# Altium PCB BopIt.PcbDoc
Units mil, origin at the board's own origin, x right, y up, seen from the top; angles counter-clockwise.
Board outline 6000 x 4000 mil, 4 copper layers (Top Layer, Layer 1, Layer 2, Bottom Layer), stack 23.756 mil thick; 39 components, 36 nets, 147 pads, 0 vias.
Unrouted connection lines stored in the file: 96.
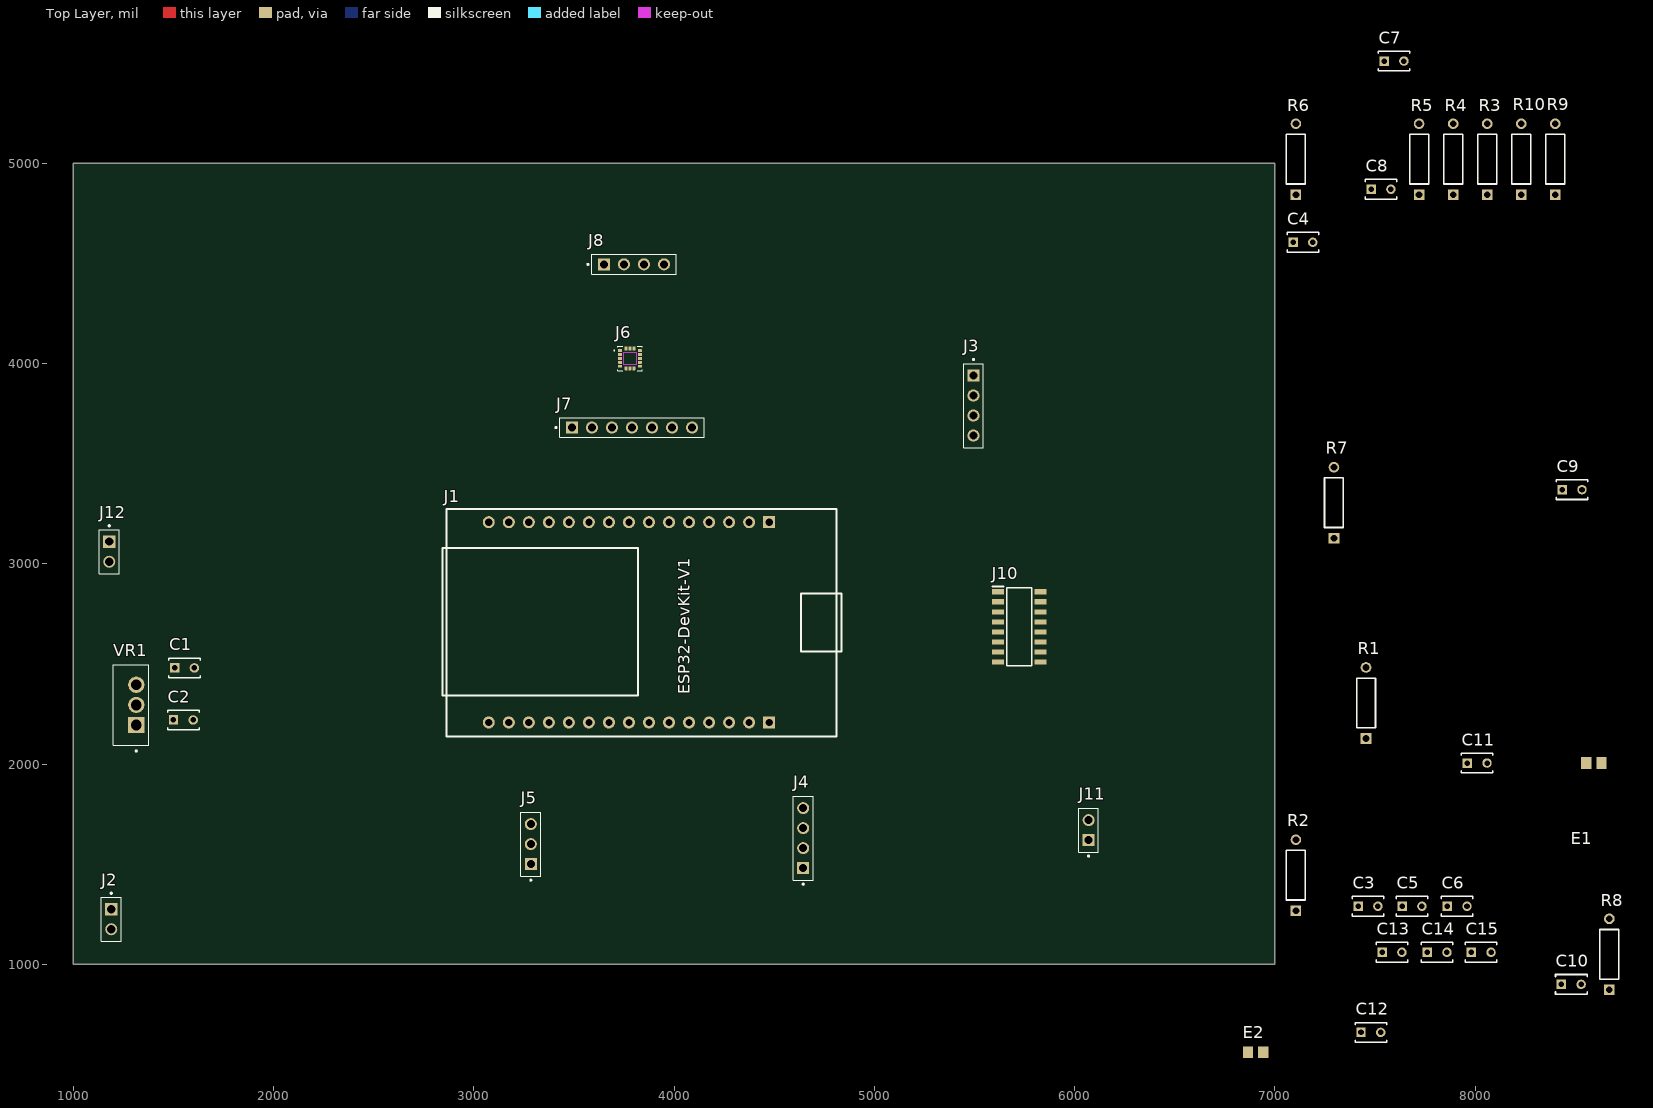
[diagram p0: Top Layer view]
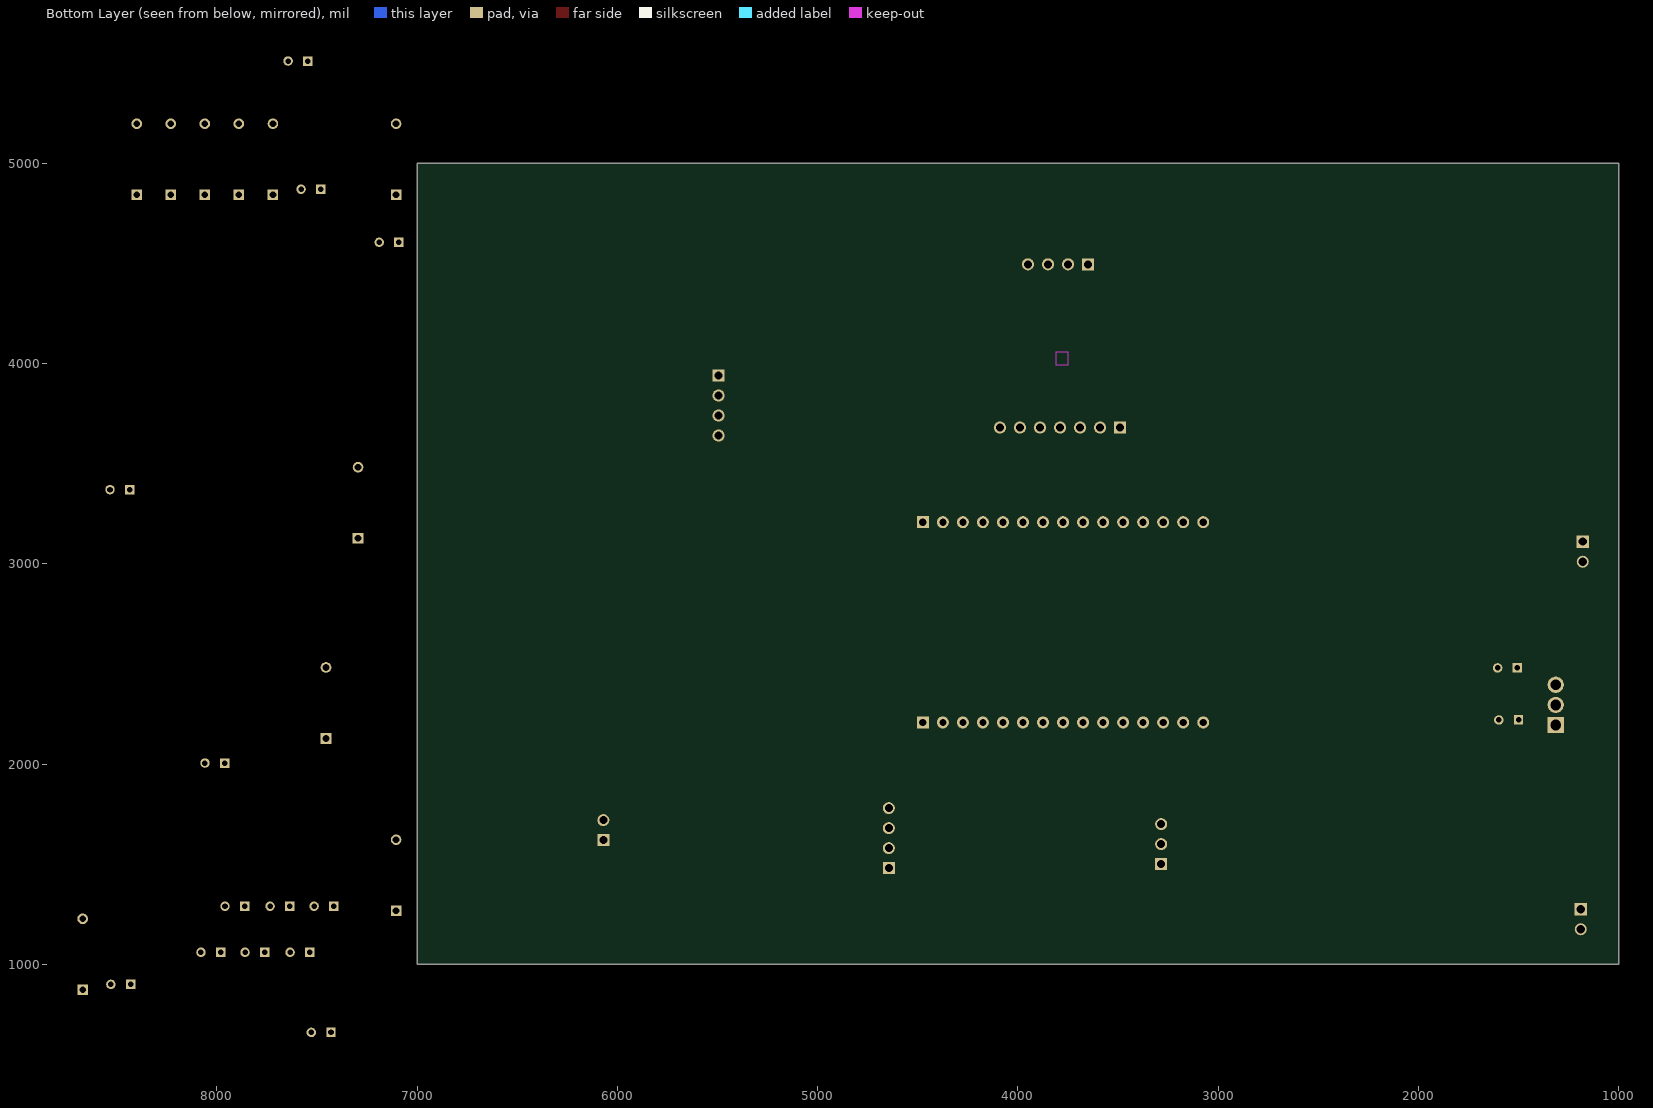
[diagram p1: Bottom Layer view, seen from below]
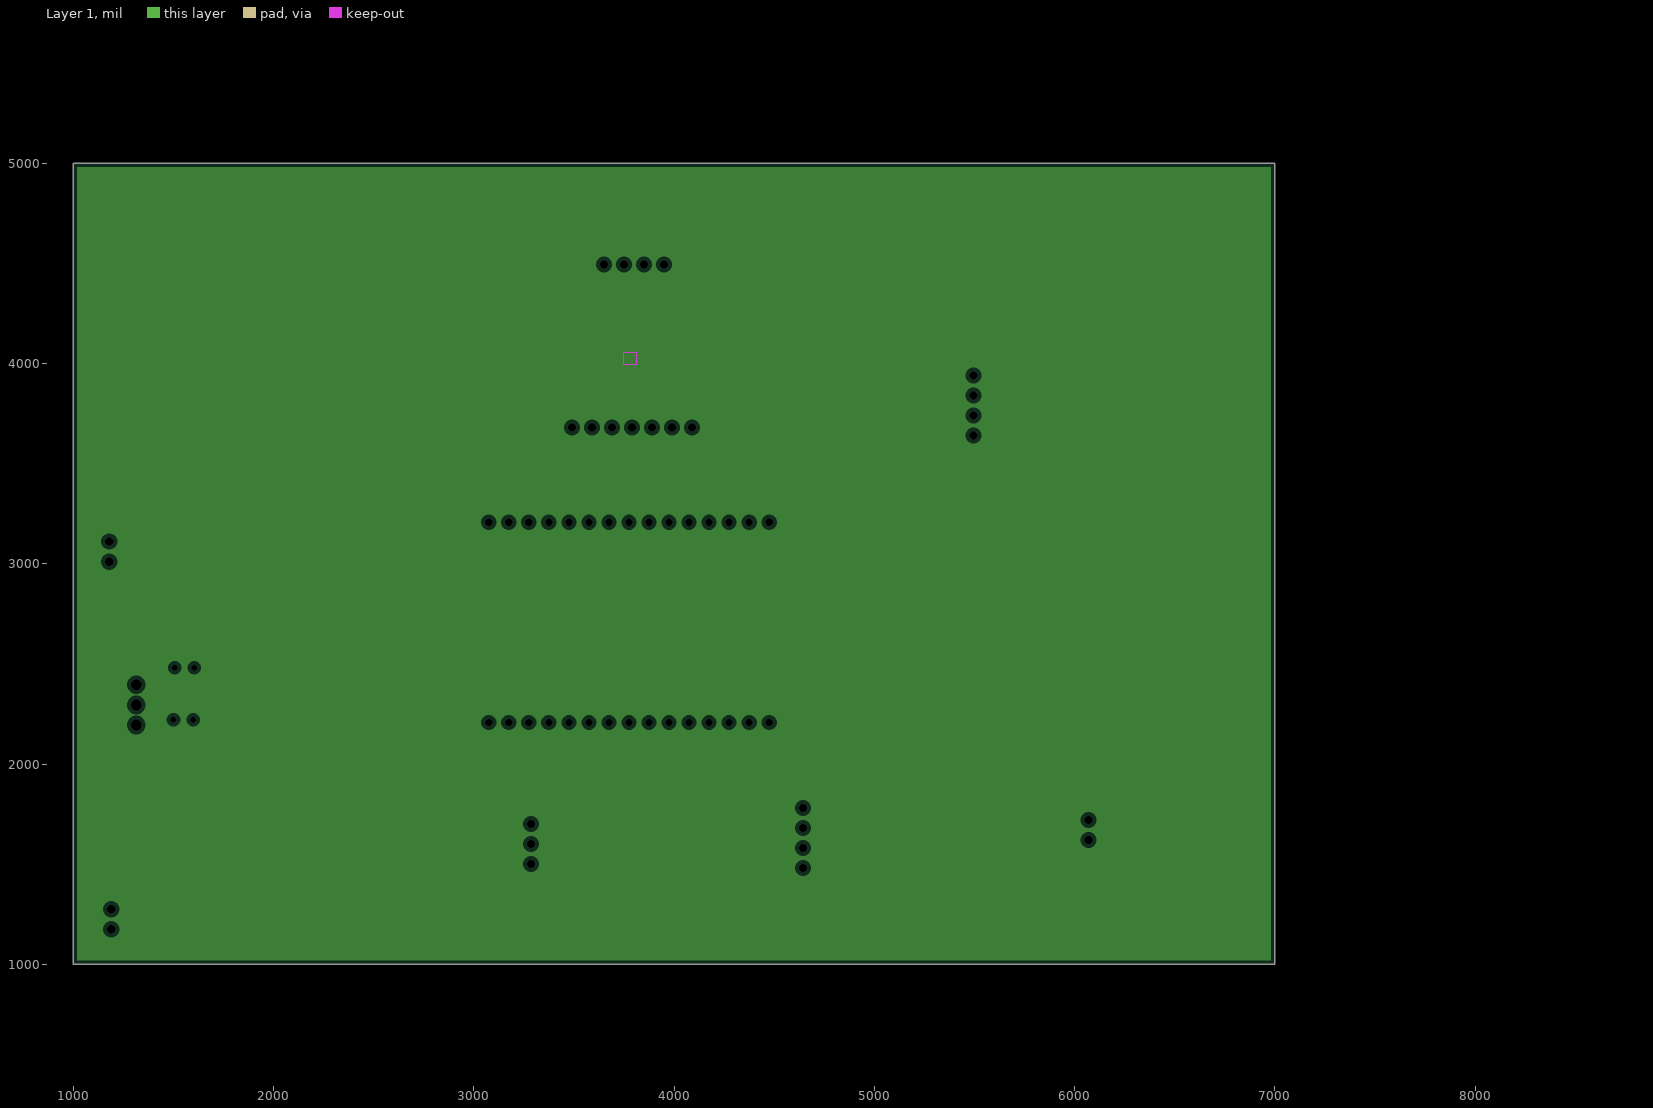
[diagram p2: Layer 1, clearances drawn from the general rule]
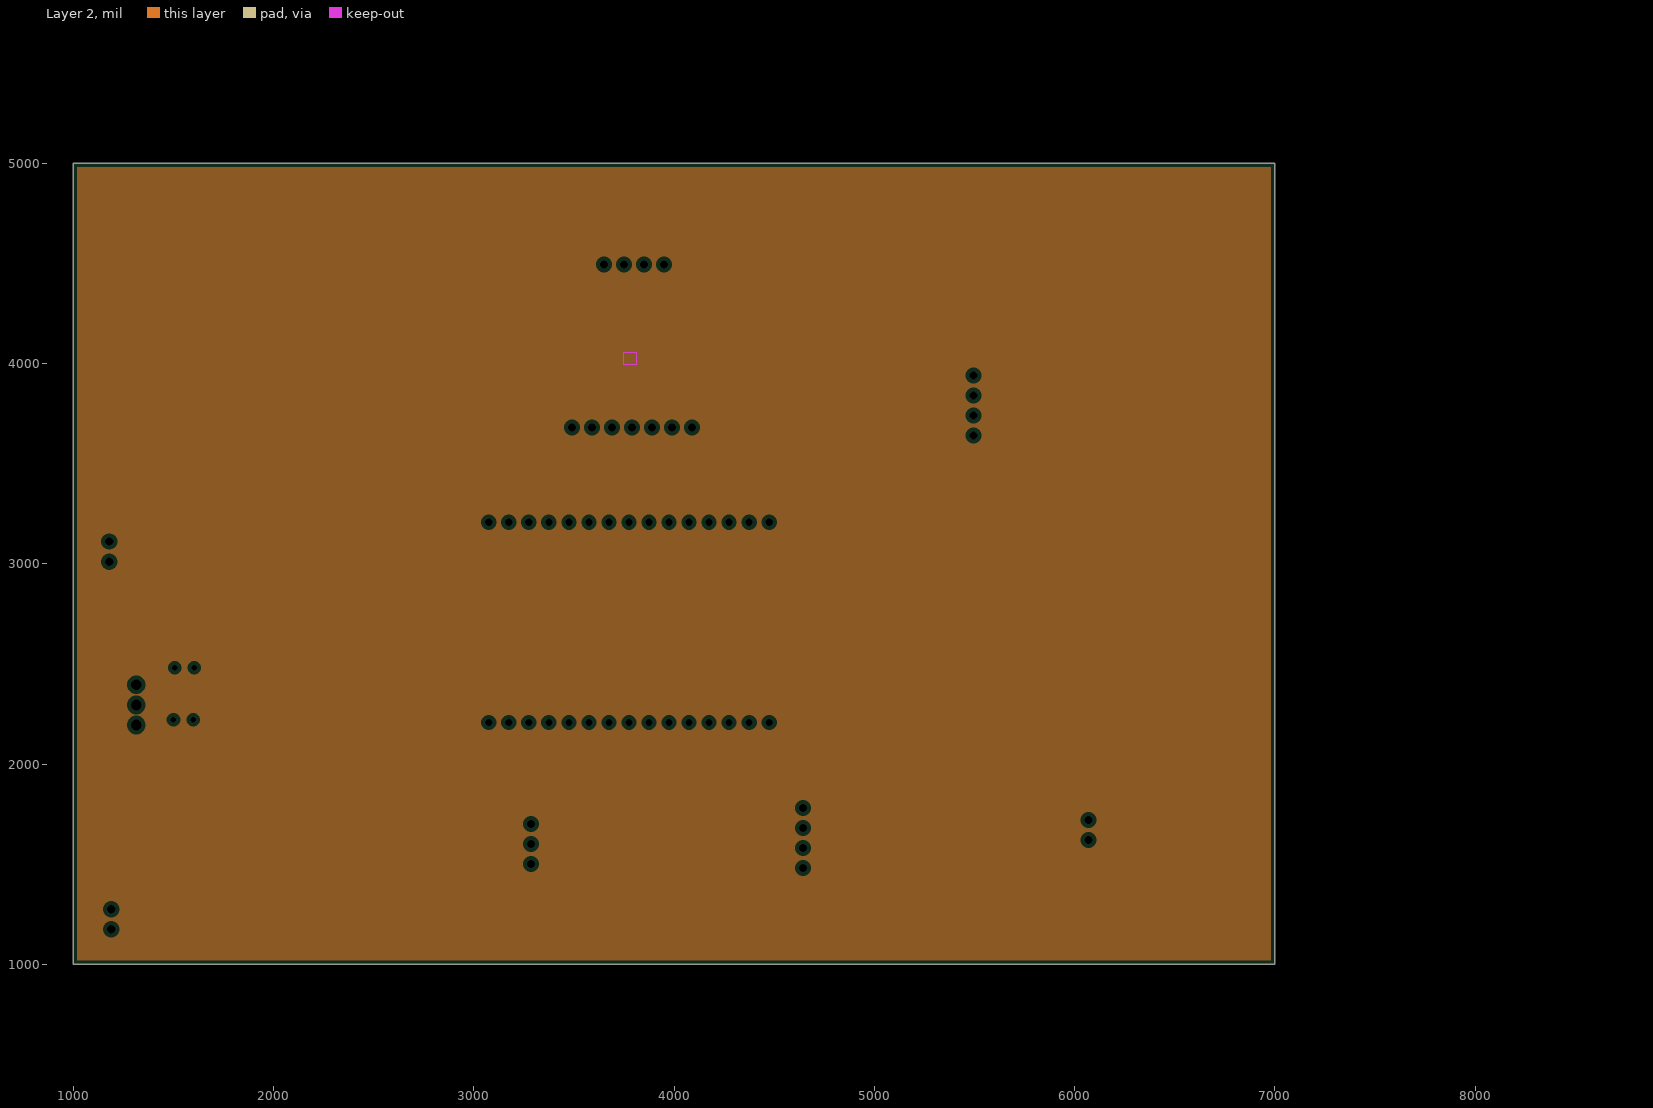
[diagram p3: Layer 2, clearances drawn from the general rule]

## Layer stack, top to bottom
Top Solder: solder mask 0.4, Solder Resist, Dk 3.5
Top Layer: signal copper 1.4
Power Plane: prepreg 2.8, PP-006, Dk 4.1
Layer 1: plane copper 1.378
Dielectric 1: dielectric 12.6, FR-4, Dk 4.8
Layer 2: plane copper 1.378
Ground Plane: prepreg 2.8, PP-006, Dk 4.1
Bottom Layer: signal copper 1.4
Bottom Solder: solder mask 0.4, Solder Resist, Dk 3.5

## Board outline
1000,1000 7000,1000 7000,5000 1000,5000

## Design rules (kind name [scope] priority, off if disabled: settings)
Clearance [All] p1: gap=10 ignorepadtopadclearanceinfootprint=FALSE
PlaneClearance [All] p1: clearance=20
PlaneConnect [All] p1: planeconnectstyle=Relief reliefexpansion=20 reliefentries=4 reliefconductorwidth=10 reliefairgap=10
PolygonConnect [All] p1: connectstyle=Relief reliefconductorwidth=10 reliefentries=4 polygonreliefangle="90 Angle" airgapwidth=10
RoutingVias [All] p1: holewidth=28 width=50 viastyle="Through Hole" minholewidth=28 minwidth=50 maxholewidth=28 maxwidth=50
SolderMaskExpansion [All] p1: expansion=0 istentingtop=FALSE
SupplyNets "Schematic Supply Nets_7" [InNet('VRO')] p1: voltage=0.000
SupplyNets "Schematic Supply Nets_6" [InNet('3.3V')] p2: voltage=0.000
SupplyNets "Schematic Supply Nets_5" [InNet('+9')] p3: voltage=0.000
SupplyNets "Schematic Supply Nets_3" [InNet('+3.3V')] p4: voltage=0.000
SupplyNets "Schematic Supply Nets_2" [InNet('5V')] p5: voltage=0.000
SupplyNets "Schematic Supply Nets_1" [InNet('GND')] p6: voltage=0.000
SupplyNets "Schematic Supply Nets" [InNet('+5')] p7: voltage=0.000
Width [All] p1: maxlimit=10 minlimit=10 preferedwidth=10
28 further rules are at their usual default settings.

## Classes and differential pairs
component class Power: C1 C2 J2 J12 VR1
component class MicroSDAdapter: C12 C15 R3 R4 R5 R6 R9 R10
component class Input: C10 C12 C13 C15 J3 J4 J5 J6 R9 R10
component class Display: J7 J8
component class DevKitESP32: J1
component class AudioAmplifier: C10 C12 C13 C14 C15 E1 E2 J10 J11 R7 R8

## Components (designator, comment, footprint, x,y, rotation, side; value= is the part's Value field where it differs from the comment)
C1 "0.33uF" FP-RHE1DB-MFG 1555.79,2480 r0 top
C2 "0.1uF" FP-RHE1DB-MFG 1550,2220 r0 top
C3 "10nF" FP-RHE1DB-MFG 7465,1290 r0 top
C4 "0.47uF" FP-RHE1DB-MFG 7140,4605 r0 top
C5 "0.1uF" FP-RHE1DB-MFG 7685,1290 r0 top
C6 "2.2uF" FP-RHE1DB-MFG 7910,1290 r0 top
C7 "0.1uF" FP-RHE1DB-MFG 7595,5510 r0 top
C8 "0.1uF" FP-RHE1DB-MFG 7530,4870 r0 top
C9 "1uF" FP-RHE1DB-MFG 8484.21,3370 r0 top
C10 "1uF" FP-RHE1DB-MFG 8480,900 r0 top
C11 "10uF" FP-RHE1DB-MFG 8010,2005 r0 top
C12 "10uF" FP-RHE1DB-MFG 7479.21,660 r0 top
C13 "1uF" FP-RHE1DB-MFG 7585,1060 r0 top
C14 "1uF" FP-RHE1DB-MFG 7810,1060 r0 top
C15 "1uF" FP-RHE1DB-MFG 8030,1060 r0 top
E1 "LI0805H121R-10" FB_LI0805H121R-10 8593.31,2005 r0 top
E2 "LI0805H121R-10" FB_LI0805H121R-10 6903.31,560 r0 top
J1 "J1" ESP32-DEVKIT-V1-FOOTPRINT 3840,2705 r90 top
J2 "SSK02-FPH-254-A2" SAMESKY_SSK02-FPH-254-A2 1190,1225 r270 top
J3 "SSK02-FPH-254-A4" SAMESKY_SSK02-FPH-254-A4 5495,3790 r270 top
J4 "SSK02-FPH-254-A4" SAMESKY_SSK02-FPH-254-A4 4645,1630 r90 top
J5 "SSK02-FPH-254-A3" SAMESKY_SSK02-FPH-254-A3 3285,1600 r90 top
J6 "IAM-20380" PQFN50P300X300X80-16N 3780,4025 r0 top
J7 "SSK02-FPH-254-A7" SAMESKY_SSK02-FPH-254-A7 3790,3680 r0 top
J8 "SSK02-FPH-254-A4" SAMESKY_SSK02-FPH-254-A4 3800,4495 r0 top
J10 "PAM8406DR" SOIC127P600X126-16N 5723.7,2685 r0 top
J11 "SSK02-FPH-254-A2" SAMESKY_SSK02-FPH-254-A2 6070,1670 r90 top
J12 "SSK02-FPH-254-A2" SAMESKY_SSK02-FPH-254-A2 1180,3060 r270 top
R1 "10K" RESA60-630X240 7455,2305 r90 top
R2 "10K" RESA60-630X240 7105,1445 r90 top
R3 "10K" RESA60-630X240 8060,5020 r90 top
R4 "10K" RESA60-630X240 7890,5020 r90 top
R5 "10K" RESA60-630X240 7720,5020 r90 top
R6 "10K" RESA60-630X240 7105,5020 r90 top
R7 "10K" RESA60-630X240 7295,3305 r90 top
R8 "10K" RESA60-630X240 8670,1050 r90 top
R9 "10K" RESA60-630X240 8400,5020 r90 top
R10 "10K" RESA60-630X240 8230,5020 r90 top
VR1 "L7805" TO255P1020X450X2000-3 1288.92,2295.39 r90 top

## Footprints (in the part's own frame and the unit in brackets; to place one, negate y for a bottom-side part, rotate by r counter-clockwise, add the part's x,y. Pads: shape width x height; smd on the part's side, far side on the other; paste and mask are expansions set on the pad)
ESP32-DEVKIT-V1-FOOTPRINT [mil]
  round 60 hole 36 paste-99999 mask+4: 1(-497.5,765) 2(-497.5,665) 3(-497.5,565) 4(-497.5,465) 5(-497.5,365) 6(-497.5,265) 7(-497.5,165) 8(-497.5,65) 9(-497.5,-35) 10(-497.5,-135) 11(-497.5,-235) 12(-497.5,-335) 13(-497.5,-435) 14(-497.5,-535) 17(502.5,-535) 18(502.5,-435) 19(502.5,-335) 20(502.5,-235) 21(502.5,-135) 22(502.5,-35) 23(502.5,65) 24(502.5,165) 25(502.5,265) 26(502.5,365) 27(502.5,465) 28(502.5,565) 29(502.5,665) 30(502.5,765)
  rect 60x60 hole 36 paste-99999 mask+4: 15(-497.5,-635) 16(502.5,-635)
  silkscreen extent -568,-995 568,995
FB_LI0805H121R-10 [mm]
  rect 1.285x1.47 smd: 1(-0.973,0) 2(0.973,0)
  body extent -1,-0.63 1,0.63, height 1.1
FP-RHE1DB-MFG [mm]
  rect 1.2x1.2 hole 0.7 paste-2539.97 mask+0: 1(-1.25,0)
  round 1.2 hole 0.7 paste-2539.97 mask+0: 2(1.25,0)
  silkscreen extent -2,-1.25 2,1.25, body extent -2.1,-1.35 2.1,1.35, height 0.25
PQFN50P300X300X80-16N [mm]
  rrect25% 0.49x0.35 smd: 1(-1.26,1) 2(-1.26,0.5) 3(-1.26,0) 4(-1.26,-0.5) 5(-1.26,-1) 9(1.26,-1) 10(1.26,-0.5) 11(1.26,0) 12(1.26,0.5) 13(1.26,1)
  rrect25% 0.35x0.49 smd: 6(-0.5,-1.26) 7(0,-1.26) 8(0.5,-1.26) 14(0.5,1.26) 15(0,1.26) 16(-0.5,1.26)
  Keep-Out Layer region: 0.8,-0.8 -0.8,-0.8 -0.8,0.8 0.8,0.8
  silkscreen extent -2.05,-1.55 1.55,1.55, body extent -1.5,-1.5 1.5,1.5, height 0.8
RESA60-630X240 [mm] "Axial Resistor, 2-Leads, Dia 2.4mm, Body Length 6.3mm"
  rect 1.35x1.35 hole 0.85: 1(-4.5,0)
  round 1.35 hole 0.85: 2(4.5,0)
  silkscreen extent -3.15,-1.2 3.15,1.2, body extent -3.15,-1.2 3.15,1.2, height 2.4
SAMESKY_SSK02-FPH-254-A2 [mm]
  rect 1.53x1.53 / inner round 1.53 / far side rect 1.53x1.53 hole 1.02 mask+0.102: 1(-1.27,0)
  round 1.53 hole 1.02 mask+0.102: 2(1.27,0)
  silkscreen extent -3.4,-1.25 2.79,1.25
SAMESKY_SSK02-FPH-254-A3 [mm]
  rect 1.53x1.53 / inner round 1.53 / far side rect 1.53x1.53 hole 1.02 mask+0.102: 1(-2.54,0)
  round 1.53 hole 1.02 mask+0.102: 2(0,0) 3(2.54,0)
  silkscreen extent -4.67,-1.25 4.06,1.25
SAMESKY_SSK02-FPH-254-A4 [mm]
  rect 1.53x1.53 / inner round 1.53 / far side rect 1.53x1.53 hole 1.02 mask+0.102: 1(-3.81,0)
  round 1.53 hole 1.02 mask+0.102: 2(-1.27,0) 3(1.27,0) 4(3.81,0)
  silkscreen extent -5.94,-1.25 5.33,1.25
SAMESKY_SSK02-FPH-254-A7 [mm]
  rect 1.53x1.53 / inner round 1.53 / far side rect 1.53x1.53 hole 1.02 mask+0.102: 1(-7.62,0)
  round 1.53 hole 1.02 mask+0.102: 2(-5.08,0) 3(-2.54,0) 4(0,0) 5(2.54,0) 6(5.08,0) 7(7.62,0)
  silkscreen extent -9.75,-1.25 9.14,1.25
SOIC127P600X126-16N [mm]
  rect 1.5x0.65 smd: 1(-2.7,4.445) 2(-2.7,3.175) 3(-2.7,1.905) 4(-2.7,0.635) 5(-2.7,-0.635) 6(-2.7,-1.905) 7(-2.7,-3.175) 8(-2.7,-4.445) 9(2.7,-4.445) 10(2.7,-3.175) 11(2.7,-1.905) 12(2.7,-0.635) 13(2.7,0.635) 14(2.7,1.905) 15(2.7,3.175) 16(2.7,4.445)
  silkscreen extent -3.45,-4.95 1.6,5.12
TO255P1020X450X2000-3 [mm]
  rect 2.055x2.055 / inner round 2.055 / far side rect 2.055x2.055 hole 1.37: 1(-2.55,-0.663)
  round 2.055 hole 1.37: 2(0,-0.663) 3(2.55,-0.663)
  silkscreen extent -5.95,-2.25 5.1,2.25, body extent -5.1,-2.25 5.1,2.25, height 20

## Part data
C1 C2 C3 C4 C5 C6 C7 C8 C9 C10 C11 C12 C13 C14 C15: library part CMP-06035-012170-1, "Ceramic Capacitor Automotive 330nF ±10% 50V X8L Radial", Capacitance=330nF, Dielectric=X8L, Max Operating Temperature=150°C, Min Operating Temperature=-55°C, Tolerance=10%, Voltage Rating=50V, Lead Pitch=2.5mm, REACH SVHC="No SVHC", Voltage Rating (DC)=50V
E1 E2: "EMI Ferrite Chip Bead, 0805, 800MA, 120Ohms @100MHz, DCR Max 0.150Ohm", Package="0805 Laird", Check_prices=https://www.snapeda.com/parts/LI0805H121R-10/Laird/view-part/?ref=eda, MF=Laird, MP=LI0805H121R-10, SnapEDA_Link=https://www.snapeda.com/parts/LI0805H121R-10/Laird/view-part/?ref=snap
J1: library part Component_1
J2 J11 J12: "2 Position Header Connector 0.100 (2.54mm) Through Hole Gold", Package=None, Check_prices=https://www.snapeda.com/parts/SSK02-FPH-254-A2/Same+Sky/view-part/?ref=eda, MF="Same Sky (Formerly CUI Devices)", MP=SSK02-FPH-254-A2, SnapEDA_Link=https://www.snapeda.com/parts/SSK02-FPH-254-A2/Same+Sky/view-part/?ref=snap
J3 J4 J8: "4 Position Header Connector 0.100 (2.54mm) Through Hole Gold", Package=None, Check_prices=https://www.snapeda.com/parts/SSK02-FPH-254-A4/Same+Sky/view-part/?ref=eda, MF="Same Sky (Formerly CUI Devices)", MP=SSK02-FPH-254-A4, SnapEDA_Link=https://www.snapeda.com/parts/SSK02-FPH-254-A4/Same+Sky/view-part/?ref=snap
J5: "2.54MM FEMALE HEADER 1X3PIN, Y T", Package=None, Check_prices=https://www.snapeda.com/parts/SSK02-FPH-254-A3/Same+Sky/view-part/?ref=eda, MF="Same Sky (Formerly CUI Devices)", MP=SSK02-FPH-254-A3, SnapEDA_Link=https://www.snapeda.com/parts/SSK02-FPH-254-A3/Same+Sky/view-part/?ref=snap
J6: "Gyroscope X (Pitch), Y (Roll), Z (Yaw) Â±250, 500, 1000, 2000 27kHz I2C, SPI 16-LGA (3x3)", Package="PQFN-16 TDK-InvenSense", Check_prices=https://www.snapeda.com/parts/IAM-20380/TDK/view-part/?ref=eda, MF="TDK InvenSense", MP=IAM-20380, SnapEDA_Link=https://www.snapeda.com/parts/IAM-20380/TDK/view-part/?ref=snap
J7: Package=None, Availability=Unavailable, MF="{'manufacturer': u'Same Sky (Formerly CUI Devices)'}", MP=SSK02-FPH-254-A7, Price=None
J10: "DiodesZetex PAM8406DR 2-Channel Audio Amplifier, Class-AB, Class-D Stereo, 16-Pin SOP", Manufacturer_Name="Diodes Incorporated", Mouser Part Number=621-PAM8406DR, Arrow Part Number=PAM8406DR, Arrow Price/Stock=https://www.arrow.com/en/products/pam8406dr/diodes-incorporated?utm_currency=USD&region=asia, Datasheet Link=https://www.diodes.com//assets/Datasheets/PAM8406.pdf, Geometry.Height=1.26mm, Manufacturer_Part_Number=PAM8406DR, Mouser Price/Stock=https://www.mouser.co.uk/ProductDetail/Diodes-Incorporated/PAM8406DR?qs=%252BSlWJf1dfkLK5VNh%252Bez%2F0Q%3D%3D
R1 R2 R3 R4 R5 R6 R7 R8 R9 R10: library part CMP-1659-00070-1, "Axial Resistor, 1 MOhm, +/- 1%, 250 mW, -55 to 155 degC, 2-Pin THD, RoHS, Bulk", Case\Package=Axial, Max Operating Temperature="155 degC", Min Operating Temperature="-55 degC", Package Quantity=200, Power Rating="250 mW", Resistance="47.5 kohm", Tolerance=1%, Voltage Rating="250 V", ComponentLink1Description="Manufacturer URL", ComponentLink1URL=http://www.yageo.com/, ComponentLink2Description=Datasheet, ComponentLink2URL=http://www.yageo.com/documents/recent/Yageo%20LR_MFR_2013.pdf, DatasheetVersion=Apr-13, Length="0.248 inch", Mount="Through Hole", PackageDescription="2-Pin Axial Lead, Dia 2.4 mm, Body Length 6.3 mm", PackageReference=MFR-25, Packaging=Bulk, RoHSCompliant=true
VR1: "Standard Regulator Pos 5V 1.5A 3-Pin(3+Tab) TO-220FP Tube", Package=None, Availability="Not in stock", Check_prices=https://www.snapeda.com/parts/L7805/STMicroelectronics/view-part/?ref=eda, MF=STMicroelectronics, MP=L7805, Price=None, SnapEDA_Link=https://www.snapeda.com/parts/L7805/STMicroelectronics/view-part/?ref=snap

## Nets (pads, with @x,y where several pads share a name; then routed paths per layer and width w, separated by ;. In a path a pad name is that pad's centre, name@x,y a point inside that pad or via, vN(x,y) a via of type N, cw(c..) or ccw(c..) an arc to the next point about the centre after c; other vN are vias at no path point)
3.3V: C3.1 C5.1 C6.1 J1.16 J3.1 J4.1 J5.1 J6.1 J6.5 J6.16 R1.2 R2.2
5V: J1.15 J7.2 J12.2
+3.3V: C7.1 C8.1 R3.2 R4.2 R5.2 R6.2 R9.2 R10.2
+5: C11.1 C12.1 C13.1 C14.1 C15.1 J10.4 J10.6 J10.13 R8.1
+9: C1.1 J2.1 VR1.1
AUDIO_DAC: C9.1 J1.8
GND: C1.2 C2.2 C3.2 C4.2 C5.2 C6.2 C7.2 C8.2 C10.2 C11.2 C12.2 C13.2 C14.2 C15.2 J1.14 J1.17 J2.2 J3.4 J4.4 J6.4 J6.8 J6.9 J6.10 J6.11 J6.12 J6.13 J6.15 J7.1 J8.2 J8.4 J10.2 J10.11 J10.15 VR1.2
I2C_SCL: J1.29 J6.2 R2.1
I2C_SDA: J1.26 J6.3 R1.1
LED_GREEN: J1.11 J8.1
LED_PURGE_BUTTON: J1.7 J4.3
LED_RED: J1.22 J8.3
LED_START_BUTTON: J1.6 J3.3
NetC4_1: C4.1 J6.14
NetC9_2: C9.2 R7.2
NetC10_1: C10.1 J10.8
NetE1_2: E1.2 J10.1
NetE2_2: E2.2 J10.3
NetJ9_1: R4.1
NetJ9_8: R3.1
NetJ10_7: J10.7 R7.1
NetJ10_9: J10.9 R8.2
OLED_CS: J1.10 J7.7
OLED_DC: J1.9 J7.6
OLED_RST: J1.20 J7.5
PURGE_BUTTON: J1.5 J4.2
SD_CD: J1.23 R6.1
SD_CS: J1.13 R5.1
SPEAKER_NEG: E2.1 J11.2
SPEAKER_POS: E1.1 J11.1
SPI_MISO: J1.25 R10.1
SPI_MOSI: J1.30 J7.4 R9.1
SPI_SCK: J1.24 J7.3
START_BUTTON: J1.21 J3.2
TRAP_SWITCH: J1.4 J5.2 J5.3
VRO: C2.1 J12.1 VR1.3
pads on no net: J1.1 J1.2 J1.3 J1.12 J1.18 J1.19 J1.27 J1.28 J6.6 J6.7 J10.5 J10.10 J10.12 J10.14 J10.16

## Polygon pours and split planes (outlines as drawn)
no net on Layer 1 (split plane): 6979.9,1020.1 1020.1,1020.1 1020.1,4979.9 6979.9,4979.9
no net on Layer 2 (split plane): 6979.9,1020.1 1020.1,1020.1 1020.1,4979.9 6979.9,4979.9

## Text inside footprints (layer, text, board x,y; h text height)
J1: Top Overlay "ESP32-DevKit-V1" at 4079.53,2347.5 h59.05 r90